# Altium PCB PWB.PcbDoc (part 4 of 5)
Units mm, origin at the board's own origin, x right, y up, seen from the top; angles counter-clockwise.
Board outline 202 x 125 mm, 2 copper layers (Top Layer, Bottom Layer), stack 1.576 mm thick; 208 components, 124 nets, 630 pads, 5440 vias.
Unrouted connection lines stored in the file: 98.
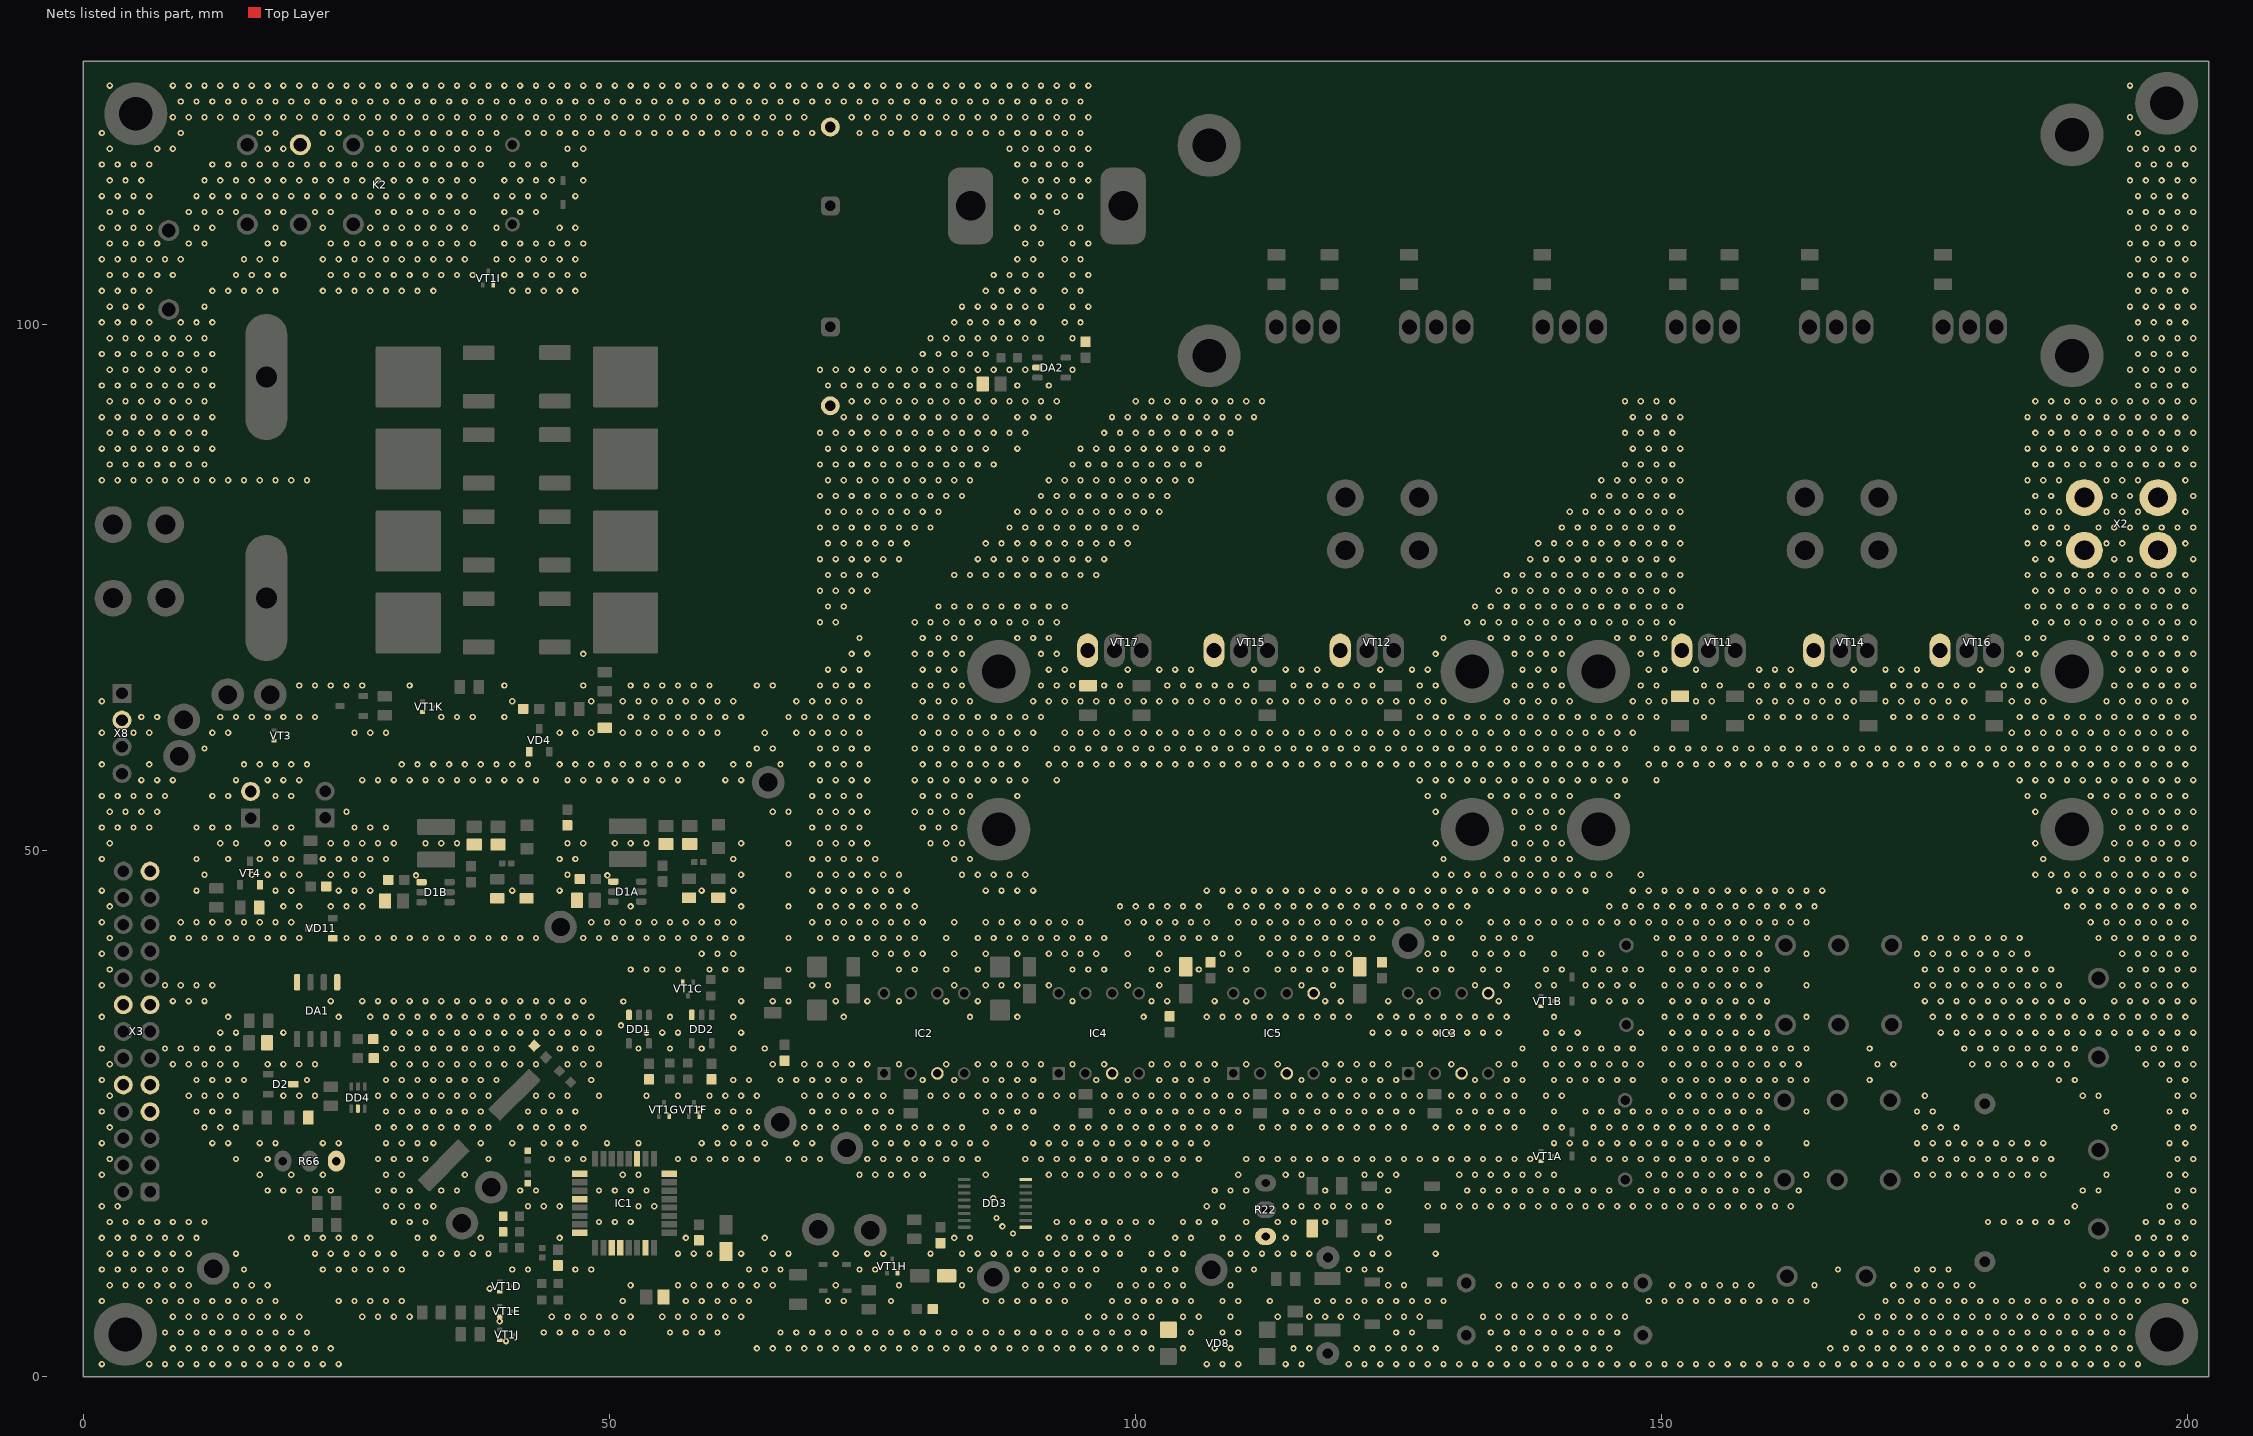
[diagram p3: the nets of this part, all layers, seen from the top]

## Via types
v1: diameter 0.6, hole 0.3, Top Layer to Bottom Layer, tented both sides, 5432 vias
v2: diameter 0.8, hole 0.4, Top Layer to Bottom Layer, tented both sides, 8 vias

## Nets (pads, with @x,y where several pads share a name; then routed paths per layer and width w, separated by ;. In a path a pad name is that pad's centre, name@x,y a point inside that pad or via, vN(x,y) a via of type N, cw(c..) or ccw(c..) an arc to the next point about the centre after c; other vN are vias at no path point) (continued)
GND: (continued)
  other v1: 1.772,1.18 6.272,1.18 7.772,1.18 9.272,1.18 10.772,1.18 12.272,1.18 13.772,1.18 15.272,1.18 16.772,1.18 18.272,1.18 19.772,1.18 21.272,1.18 22.772,1.18 24.272,1.18 106.772,1.18 108.272,1.18 109.772,1.18 114.272,1.18 115.772,1.18 120.272,1.18 121.772,1.18 123.272,1.18 124.772,1.18 126.272,1.18 127.772,1.18 129.272,1.18 130.772,1.18 132.272,1.18 133.772,1.18 135.272,1.18 136.772,1.18 138.272,1.18 139.772,1.18 141.272,1.18 142.772,1.18 144.272,1.18 145.772,1.18 147.272,1.18 148.772,1.18 150.272,1.18 151.772,1.18 153.272,1.18 154.772,1.18 156.272,1.18 157.772,1.18 159.272,1.18 160.772,1.18 162.272,1.18 163.772,1.18 165.272,1.18 166.772,1.18 168.272,1.18 169.772,1.18 171.272,1.18 172.772,1.18 174.272,1.18 175.772,1.18 177.272,1.18 178.772,1.18 180.272,1.18 181.772,1.18 183.272,1.18 184.772,1.18 186.272,1.18 187.772,1.18 189.272,1.18 190.772,1.18 192.272,1.18 193.772,1.18 195.272,1.18 8.522,2.68 10.022,2.68 11.522,2.68 13.022,2.68 14.522,2.68 16.022,2.68 17.522,2.68 19.022,2.68 20.522,2.68 22.022,2.68 23.522,2.68 64.022,2.68 65.522,2.68 67.022,2.68 68.522,2.68 70.022,2.68 71.522,2.68 73.022,2.68 74.522,2.68 76.022,2.68 77.522,2.68 79.022,2.68 80.522,2.68 82.022,2.68 83.522,2.68 85.022,2.68 86.522,2.68 88.022,2.68 89.522,2.68 91.022,2.68 92.522,2.68 94.022,2.68 95.522,2.68 97.022,2.68 98.522,2.68 100.022,2.68 101.522,2.68 104.522,2.68 107.522,2.68 109.022,2.68 115.022,2.68 116.522,2.68 121.022,2.68 122.522,2.68 124.022,2.68 125.522,2.68 127.022,2.68 128.522,2.68 134.522,2.68 136.022,2.68 137.522,2.68 139.022,2.68 140.522,2.68 142.022,2.68 143.522,2.68 145.022,2.68 166.022,2.68 167.522,2.68 169.022,2.68 170.522,2.68 172.022,2.68 173.522,2.68 175.022,2.68 176.522,2.68 178.022,2.68 179.522,2.68 181.022,2.68 182.522,2.68 184.022,2.68 185.522,2.68 187.022,2.68 188.522,2.68 190.022,2.68 191.522,2.68 193.022,2.68 194.522,2.68 7.772,4.18 9.272,4.18 10.772,4.18 12.272,4.18 13.772,4.18 15.272,4.18 16.772,4.18 18.272,4.18 19.772,4.18 21.272,4.18 43.772,4.18 45.272,4.18 46.772,4.18 48.272,4.18 49.772,4.18 51.272,4.18 55.772,4.18 57.272,4.18 58.772,4.18 60.272,4.18 66.272,4.18 67.772,4.18 69.272,4.18 70.772,4.18 72.272,4.18 73.772,4.18 75.272,4.18 76.772,4.18 78.272,4.18 79.772,4.18 81.272,4.18 82.772,4.18 84.272,4.18 85.772,4.18 87.272,4.18 88.772,4.18 90.272,4.18 91.772,4.18 93.272,4.18 94.772,4.18 96.272,4.18 97.772,4.18 99.272,4.18 100.772,4.18 105.272,4.18 108.272,4.18 109.772,4.18 124.772,4.18 126.272,4.18 133.772,4.18 135.272,4.18 136.772,4.18 138.272,4.18 139.772,4.18 141.272,4.18 142.772,4.18 144.272,4.18 145.772,4.18 168.272,4.18 169.772,4.18 171.272,4.18 172.772,4.18 174.272,4.18 175.772,4.18 177.272,4.18 178.772,4.18 180.272,4.18 181.772,4.18 183.272,4.18 184.772,4.18 186.272,4.18 187.772,4.18 189.272,4.18 190.772,4.18 192.272,4.18 193.772,4.18 39.573,5.258 8.522,5.68 10.022,5.68 11.522,5.68 13.022,5.68 14.522,5.68 16.022,5.68 17.522,5.68 19.022,5.68 20.522,5.68 26.522,5.68 28.022,5.68 29.522,5.68 31.022,5.68 44.522,5.68 46.022,5.68 47.522,5.68 49.022,5.68 50.522,5.68 52.022,5.68 55.022,5.68 56.522,5.68 58.022,5.68 59.522,5.68 61.022,5.68 62.522,5.68 95.522,5.68 97.022,5.68 98.522,5.68 100.022,5.68 101.522,5.68 104.522,5.68 106.022,5.68 109.022,5.68 113.522,5.68 116.522,5.68 118.022,5.68 119.522,5.68 121.022,5.68 124.022,5.68 125.522,5.68 127.022,5.68 133.022,5.68 134.522,5.68 136.022,5.68 137.522,5.68 139.022,5.68 140.522,5.68 142.022,5.68 143.522,5.68 145.022,5.68 146.522,5.68 169.022,5.68 170.522,5.68 172.022,5.68 173.522,5.68 175.022,5.68 176.522,5.68 178.022,5.68 179.522,5.68 181.022,5.68 182.522,5.68 184.022,5.68 185.522,5.68 187.022,5.68 188.522,5.68 190.022,5.68 191.522,5.68 193.022,5.68 194.522,5.68 1.772,7.18 6.272,7.18 7.772,7.18 9.272,7.18 10.772,7.18 12.272,7.18 13.772,7.18 15.272,7.18 16.772,7.18 18.272,7.18 24.272,7.18 25.772,7.18 27.272,7.18 28.772,7.18 30.272,7.18 51.272,7.18 57.272,7.18 58.772,7.18 60.272,7.18 61.772,7.18 63.272,7.18 70.772,7.18 72.272,7.18 76.772,7.18 85.772,7.18 87.272,7.18 88.772,7.18 90.272,7.18 91.772,7.18 93.272,7.18 97.772,7.18 99.272,7.18 100.772,7.18 102.272,7.18 103.772,7.18 105.272,7.18 108.272,7.18 109.772,7.18 112.772,7.18 117.272,7.18 118.772,7.18 120.272,7.18 121.772,7.18 123.272,7.18 124.772,7.18 126.272,7.18 127.772,7.18 129.272,7.18 148.772,7.18 150.272,7.18 151.772,7.18 153.272,7.18 154.772,7.18 156.272,7.18 157.772,7.18 159.272,7.18 160.772,7.18 162.272,7.18 163.772,7.18 171.272,7.18 172.772,7.18 174.272,7.18 175.772,7.18 177.272,7.18 178.772,7.18 180.272,7.18 181.772,7.18 183.272,7.18 184.772,7.18 186.272,7.18 187.772,7.18 189.272,7.18 190.772,7.18 192.272,7.18 193.772,7.18 195.272,7.18 199.772,7.18 38.633,8.357 2.522,8.68 4.022,8.68 5.522,8.68 7.022,8.68 8.522,8.68 10.022,8.68 14.522,8.68 16.022,8.68 17.522,8.68 52.022,8.68 56.522,8.68 58.022,8.68 59.522,8.68 61.022,8.68 62.522,8.68 64.022,8.68 65.522,8.68 71.522,8.68 77.522,8.68 83.522,8.68 89.522,8.68 91.022,8.68 92.522,8.68 94.022,8.68 95.522,8.68 98.522,8.68 100.022,8.68 101.522,8.68 103.022,8.68 104.522,8.68 109.022,8.68 124.022,8.68 125.522,8.68 134.522,8.68 136.022,8.68 137.522,8.68 139.022,8.68 140.522,8.68 142.022,8.68 143.522,8.68 145.022,8.68 146.522,8.68 151.022,8.68 152.522,8.68 154.022,8.68 155.522,8.68 157.022,8.68 158.522,8.68 164.522,8.68 172.022,8.68 173.522,8.68 175.022,8.68 176.522,8.68 178.022,8.68 179.522,8.68 190.022,8.68 191.522,8.68 193.022,8.68 194.522,8.68 196.022,8.68 197.522,8.68 199.022,8.68 200.522,8.68 1.772,10.18 3.272,10.18 4.772,10.18 6.272,10.18 7.772,10.18 9.272,10.18 15.272,10.18 22.772,10.18 24.272,10.18 25.772,10.18 27.272,10.18 28.772,10.18 30.272,10.18 40.772,10.18 42.272,10.18 46.772,10.18 48.272,10.18 63.272,10.18 64.772,10.18 66.272,10.18 73.772,10.18 75.272,10.18 84.272,10.18 88.772,10.18 90.272,10.18 91.772,10.18 93.272,10.18 94.772,10.18 96.272,10.18 100.772,10.18 102.272,10.18 103.772,10.18 109.772,10.18 111.272,10.18 120.272,10.18 121.772,10.18 123.272,10.18 166.772,10.18 174.272,10.18 175.772,10.18 177.272,10.18 192.272,10.18 193.772,10.18 195.272,10.18 196.772,10.18 198.272,10.18 199.772,10.18 2.522,11.68 4.022,11.68 5.522,11.68 7.022,11.68 8.522,11.68 10.022,11.68 14.522,11.68 22.022,11.68 23.522,11.68 25.022,11.68 26.522,11.68 28.022,11.68 29.522,11.68 32.522,11.68 34.022,11.68 35.522,11.68 37.022,11.68 38.522,11.68 56.522,11.68 58.022,11.68 59.522,11.68 62.522,11.68 65.522,11.68 67.022,11.68 71.522,11.68 74.522,11.68 76.022,11.68 80.522,11.68 83.522,11.68 85.022,11.68 86.522,11.68 88.022,11.68 89.522,11.68 91.022,11.68 92.522,11.68 94.022,11.68 95.522,11.68 97.022,11.68 98.522,11.68 101.522,11.68 103.022,11.68 104.522,11.68 109.022,11.68 110.522,11.68 112.022,11.68 113.522,11.68 115.022,11.68 116.522,11.68 121.022,11.68 122.522,11.68 124.022,11.68 128.522,11.68 193.022,11.68 194.522,11.68 196.022,11.68 197.522,11.68 199.022,11.68 200.522,11.68 1.772,13.18 3.272,13.18 4.772,13.18 6.272,13.18 7.772,13.18 9.272,13.18 10.772,13.18 19.772,13.18 21.272,13.18 22.772,13.18 24.272,13.18 25.772,13.18 27.272,13.18 31.772,13.18 33.272,13.18 37.772,13.18 45.272,13.18 57.272,13.18 64.772,13.18 82.772,13.18 84.272,13.18 91.772,13.18 93.272,13.18 94.772,13.18 96.272,13.18 97.772,13.18 99.272,13.18 103.772,13.18 105.272,13.18 108.272,13.18 109.772,13.18 114.272,13.18 123.272,13.18 195.272,13.18 196.772,13.18 198.272,13.18 199.772,13.18 88.367,13.589 87.351,14.275 2.522,14.68 4.022,14.68 5.522,14.68 7.022,14.68 8.522,14.68 10.022,14.68 11.522,14.68 29.522,14.68 31.022,14.68 32.522,14.68 49.022,14.68 50.522,14.68 52.022,14.68 92.522,14.68 94.022,14.68 95.522,14.68 97.022,14.68 98.522,14.68 100.022,14.68 101.522,14.68 104.522,14.68 106.022,14.68 107.522,14.68 110.522,14.68 113.522,14.68 115.022,14.68 118.022,14.68 124.022,14.68 181.022,14.68 182.522,14.68 184.022,14.68 185.522,14.68 187.022,14.68 188.522,14.68 196.022,14.68 197.522,14.68 199.022,14.68 200.522,14.68 86.792,15.062 1.772,16.18 3.272,16.18 28.772,16.18 30.272,16.18 31.772,16.18 33.272,16.18 42.272,16.18 43.772,16.18 45.272,16.18 52.772,16.18 54.272,16.18 106.772,16.18 108.272,16.18 114.272,16.18 115.772,16.18 117.272,16.18 118.772,16.18 120.272,16.18 121.772,16.18 123.272,16.18 127.772,16.18 129.272,16.18 130.772,16.18 132.272,16.18 133.772,16.18 135.272,16.18 136.772,16.18 138.272,16.18 139.772,16.18 141.272,16.18 142.772,16.18 144.272,16.18 145.772,16.18 147.272,16.18 148.772,16.18 150.272,16.18 151.772,16.18 153.272,16.18 154.772,16.18 156.272,16.18 157.772,16.18 159.272,16.18 160.772,16.18 162.272,16.18 189.272,16.18 198.272,16.18 199.772,16.18 86.487,16.942 17.522,17.68 19.022,17.68 20.522,17.68 22.022,17.68 23.522,17.68 28.022,17.68 29.522,17.68 31.022,17.68 34.022,17.68 35.522,17.68 41.522,17.68 43.022,17.68 49.022,17.68 50.522,17.68 52.022,17.68 53.522,17.68 107.522,17.68 109.022,17.68 110.522,17.68 118.022,17.68 124.022,17.68 131.522,17.68 133.022,17.68 134.522,17.68 136.022,17.68 137.522,17.68 139.022,17.68 140.522,17.68 142.022,17.68 143.522,17.68 145.022,17.68 148.022,17.68 149.522,17.68 151.022,17.68 152.522,17.68 154.022,17.68 155.522,17.68 157.022,17.68 158.522,17.68 160.022,17.68 163.022,17.68 190.022,17.68 191.522,17.68 199.022,17.68 200.522,17.68 1.772,19.18 16.772,19.18 19.772,19.18 22.772,19.18 28.772,19.18 30.272,19.18 36.272,19.18 51.272,19.18 52.772,19.18 73.772,19.18 75.272,19.18 76.772,19.18 78.272,19.18 79.772,19.18 85.772,19.18 91.772,19.18 93.272,19.18 94.772,19.18 96.272,19.18 97.772,19.18 99.272,19.18 100.772,19.18 102.272,19.18 103.772,19.18 109.772,19.18 114.272,19.18 115.772,19.18 121.772,19.18 123.272,19.18 124.772,19.18 130.772,19.18 132.272,19.18 133.772,19.18 135.272,19.18 136.772,19.18 138.272,19.18 139.772,19.18 148.772,19.18 150.272,19.18 151.772,19.18 153.272,19.18 154.772,19.18 156.272,19.18 157.772,19.18 159.272,19.18 163.772,19.18 174.272,19.18 175.772,19.18 177.272,19.18 178.772,19.18 180.272,19.18 181.772,19.18 183.272,19.18 184.772,19.18 186.272,19.18 192.272,19.18 198.272,19.18 199.772,19.18 2.522,20.68 14.522,20.68 17.522,20.68 28.022,20.68 29.522,20.68 31.022,20.68 32.522,20.68 38.522,20.68 44.522,20.68 46.022,20.68 47.522,20.68 56.522,20.68 58.022,20.68 59.522,20.68 61.022,20.68 62.522,20.68 64.022,20.68 67.022,20.68 68.522,20.68 70.022,20.68 74.522,20.68 76.022,20.68 77.522,20.68 79.022,20.68 80.522,20.68 82.022,20.68 83.522,20.68 85.022,20.68 89.522,20.68 91.022,20.68 92.522,20.68 94.022,20.68 95.522,20.68 97.022,20.68 98.522,20.68 100.022,20.68 101.522,20.68 103.022,20.68 104.522,20.68 106.022,20.68 110.522,20.68 112.022,20.68 113.522,20.68 115.022,20.68 116.522,20.68 118.022,20.68 119.522,20.68 121.022,20.68 122.522,20.68 124.022,20.68 125.522,20.68 127.022,20.68 128.522,20.68 130.022,20.68 131.522,20.68 133.022,20.68 134.522,20.68 136.022,20.68 137.522,20.68 143.522,20.68 145.022,20.68 146.522,20.68 148.022,20.68 149.522,20.68 151.022,20.68 152.522,20.68 154.022,20.68 155.522,20.68 157.022,20.68 158.522,20.68 160.022,20.68 175.022,20.68 176.522,20.68 178.022,20.68 179.522,20.68 181.022,20.68 182.522,20.68 184.022,20.68 185.522,20.68 187.022,20.68 199.022,20.68 200.522,20.68 1.772,22.18 12.272,22.18 13.772,22.18 16.772,22.18 18.272,22.18 22.772,22.18 24.272,22.18 28.772,22.18 30.272,22.18 31.772,22.18 33.272,22.18 37.772,22.18 40.772,22.18 43.772,22.18 45.272,22.18 46.772,22.18 49.772,22.18 52.772,22.18 58.772,22.18 60.272,22.18 61.772,22.18 63.272,22.18 64.772,22.18 67.772,22.18 69.272,22.18 75.272,22.18 76.772,22.18 78.272,22.18 79.772,22.18 81.272,22.18 82.772,22.18 84.272,22.18 85.772,22.18 90.272,22.18 91.772,22.18 93.272,22.18 94.772,22.18 96.272,22.18 97.772,22.18 99.272,22.18 100.772,22.18 102.272,22.18 103.772,22.18 105.272,22.18 106.772,22.18 139.772,22.18 141.272,22.18 142.772,22.18 144.272,22.18 145.772,22.18 147.272,22.18 148.772,22.18 150.272,22.18 151.772,22.18 153.272,22.18 154.772,22.18 156.272,22.18 157.772,22.18 159.272,22.18 163.772,22.18 174.272,22.18 175.772,22.18 177.272,22.18 178.772,22.18 180.272,22.18 181.772,22.18 183.272,22.18 184.772,22.18 186.272,22.18 198.272,22.18 199.772,22.18 2.522,23.68 11.522,23.68 13.022,23.68 14.522,23.68 28.022,23.68 29.522,23.68 31.022,23.68 32.522,23.68 34.022,23.68 35.522,23.68 37.022,23.68 38.522,23.68 41.522,23.68 43.022,23.68 44.522,23.68 46.022,23.68 47.522,23.68 61.022,23.68 62.522,23.68 64.022,23.68 68.522,23.68 70.022,23.68 71.522,23.68 74.522,23.68 76.022,23.68 77.522,23.68 79.022,23.68 80.522,23.68 82.022,23.68 83.522,23.68 86.522,23.68 88.022,23.68 89.522,23.68 92.522,23.68 94.022,23.68 95.522,23.68 97.022,23.68 98.522,23.68 100.022,23.68 101.522,23.68 103.022,23.68 104.522,23.68 106.022,23.68 107.522,23.68 109.022,23.68 112.022,23.68 113.522,23.68 115.022,23.68 116.522,23.68 118.022,23.68 119.522,23.68 121.022,23.68 122.522,23.68 124.022,23.68 125.522,23.68 128.522,23.68 130.022,23.68 131.522,23.68 133.022,23.68 134.522,23.68 136.022,23.68 139.022,23.68 140.522,23.68 143.522,23.68 145.022,23.68 146.522,23.68 148.022,23.68 149.522,23.68 151.022,23.68 152.522,23.68 154.022,23.68 155.522,23.68 157.022,23.68 158.522,23.68 160.022,23.68 175.022,23.68 176.522,23.68 178.022,23.68 193.022,23.68 199.022,23.68 200.522,23.68 1.772,25.18 10.772,25.18 12.272,25.18 13.772,25.18 28.772,25.18 30.272,25.18 31.772,25.18 33.272,25.18 34.772,25.18 36.272,25.18 37.772,25.18 42.272,25.18 43.772,25.18 45.272,25.18 46.772,25.18 60.272,25.18 61.772,25.18 63.272,25.18 69.272,25.18 70.772,25.18 72.272,25.18 73.772,25.18 75.272,25.18 76.772,25.18 85.772,25.18 87.272,25.18 88.772,25.18 90.272,25.18 97.772,25.18 99.272,25.18 100.772,25.18 102.272,25.18 103.772,25.18 105.272,25.18 106.772,25.18 108.272,25.18 109.772,25.18 114.272,25.18 115.772,25.18 117.272,25.18 118.772,25.18 120.272,25.18 121.772,25.18 123.272,25.18 124.772,25.18 126.272,25.18 130.772,25.18 132.272,25.18 133.772,25.18 135.272,25.18 136.772,25.18 139.772,25.18 142.772,25.18 144.272,25.18 145.772,25.18 147.272,25.18 148.772,25.18 150.272,25.18 151.772,25.18 153.272,25.18 154.772,25.18 156.272,25.18 157.772,25.18 159.272,25.18 163.772,25.18 174.272,25.18 175.772,25.18 192.272,25.18 198.272,25.18 199.772,25.18 2.522,26.68 10.022,26.68 11.522,26.68 13.022,26.68 14.522,26.68 19.022,26.68 20.522,26.68 22.022,26.68 28.022,26.68 29.522,26.68 31.022,26.68 32.522,26.68 34.022,26.68 35.522,26.68 37.022,26.68 38.522,26.68 43.022,26.68 44.522,26.68 46.022,26.68 49.022,26.68 53.522,26.68 56.522,26.68 59.522,26.68 61.022,26.68 62.522,26.68 64.022,26.68 68.522,26.68 70.022,26.68 71.522,26.68 73.022,26.68 74.522,26.68 76.022,26.68 80.522,26.68 82.022,26.68 83.522,26.68 85.022,26.68 86.522,26.68 88.022,26.68 89.522,26.68 91.022,26.68 92.522,26.68 94.022,26.68 97.022,26.68 98.522,26.68 100.022,26.68 101.522,26.68 103.022,26.68 104.522,26.68 106.022,26.68 107.522,26.68 109.022,26.68 110.522,26.68 113.522,26.68 115.022,26.68 116.522,26.68 118.022,26.68 119.522,26.68 121.022,26.68 122.522,26.68 124.022,26.68 125.522,26.68 127.022,26.68 130.022,26.68 131.522,26.68 133.022,26.68 134.522,26.68 136.022,26.68 139.022,26.68 140.522,26.68 151.022,26.68 152.522,26.68 154.022,26.68 155.522,26.68 157.022,26.68 158.522,26.68 160.022,26.68 175.022,26.68 190.022,26.68 191.522,26.68 199.022,26.68 200.522,26.68 1.772,28.18 10.772,28.18 12.272,28.18 13.772,28.18 15.272,28.18 21.272,28.18 28.772,28.18 30.272,28.18 31.772,28.18 33.272,28.18 34.772,28.18 36.272,28.18 37.772,28.18 39.272,28.18 48.272,28.18 61.772,28.18 63.272,28.18 66.272,28.18 67.772,28.18 69.272,28.18 70.772,28.18 72.272,28.18 73.772,28.18 79.772,28.18 82.772,28.18 85.772,28.18 87.272,28.18 88.772,28.18 90.272,28.18 96.272,28.18 99.272,28.18 102.272,28.18 103.772,28.18 105.272,28.18 106.772,28.18 115.772,28.18 118.772,28.18 120.272,28.18 121.772,28.18 123.272,28.18 124.772,28.18 132.272,28.18 135.272,28.18 136.772,28.18 139.772,28.18 141.272,28.18 142.772,28.18 144.272,28.18 145.772,28.18 147.272,28.18 150.272,28.18 151.772,28.18 153.272,28.18 154.772,28.18 156.272,28.18 157.772,28.18 159.272,28.18 160.772,28.18 162.272,28.18 163.772,28.18 169.772,28.18 187.772,28.18 189.272,28.18 198.272,28.18 199.772,28.18 2.522,29.68 8.522,29.68 10.022,29.68 11.522,29.68 13.022,29.68 14.522,29.68 17.522,29.68 19.022,29.68 20.522,29.68 22.022,29.68 29.522,29.68 31.022,29.68 32.522,29.68 34.022,29.68 35.522,29.68 37.022,29.68 38.522,29.68 40.022,29.68 41.522,29.68 43.022,29.68 46.022,29.68 47.522,29.68 49.022,29.68 65.522,29.68 68.522,29.68 70.022,29.68 71.522,29.68 73.022,29.68 74.522,29.68 77.522,29.68 82.022,29.68 85.022,29.68 86.522,29.68 88.022,29.68 89.522,29.68 91.022,29.68 94.022,29.68 97.022,29.68 101.522,29.68 103.022,29.68 104.522,29.68 106.022,29.68 107.522,29.68 110.522,29.68 113.522,29.68 118.022,29.68 119.522,29.68 121.022,29.68 122.522,29.68 124.022,29.68 127.022,29.68 130.022,29.68 134.522,29.68 136.022,29.68 139.022,29.68 140.522,29.68 142.022,29.68 143.522,29.68 145.022,29.68 146.522,29.68 148.022,29.68 151.022,29.68 152.522,29.68 154.022,29.68 155.522,29.68 157.022,29.68 158.522,29.68 160.022,29.68 161.522,29.68 163.022,29.68 170.522,29.68 172.022,29.68 179.522,29.68 181.022,29.68 182.522,29.68 184.022,29.68 185.522,29.68 187.022,29.68 188.522,29.68 196.022,29.68 197.522,29.68 199.022,29.68 200.522,29.68 1.772,31.18 7.772,31.18 9.272,31.18 10.772,31.18 12.272,31.18 13.772,31.18 28.772,31.18 30.272,31.18 31.772,31.18 33.272,31.18 34.772,31.18 36.272,31.18 37.772,31.18 39.272,31.18 40.772,31.18 45.272,31.18 46.772,31.18 48.272,31.18 52.772,31.18 55.772,31.18 58.772,31.18 61.772,31.18 64.772,31.18 136.772,31.18 139.772,31.18 141.272,31.18 142.772,31.18 144.272,31.18 145.772,31.18 147.272,31.18 150.272,31.18 151.772,31.18 153.272,31.18 154.772,31.18 156.272,31.18 157.772,31.18 159.272,31.18 160.772,31.18 162.272,31.18 163.772,31.18 169.772,31.18 178.772,31.18 180.272,31.18 181.772,31.18 183.272,31.18 184.772,31.18 186.272,31.18 187.772,31.18 189.272,31.18 195.272,31.18 196.772,31.18 198.272,31.18 199.772,31.18 13.022,32.68 14.522,32.68 19.022,32.68 29.522,32.68 31.022,32.68 32.522,32.68 34.022,32.68 35.522,32.68 37.022,32.68 38.522,32.68 40.022,32.68 41.522,32.68 43.022,32.68 44.522,32.68 46.022,32.68 47.522,32.68 49.022,32.68 53.522,32.68 55.022,32.68 56.522,32.68 62.522,32.68 122.522,32.68 124.022,32.68 125.522,32.68 127.022,32.68 128.522,32.68 130.022,32.68 131.522,32.68 133.022,32.68 134.522,32.68 139.022,32.68 140.522,32.68 142.022,32.68 148.022,32.68 151.022,32.68 152.522,32.68 154.022,32.68 155.522,32.68 157.022,32.68 158.522,32.68 160.022,32.68 176.522,32.68 178.022,32.68 179.522,32.68 181.022,32.68 182.522,32.68 184.022,32.68 185.522,32.68 187.022,32.68 188.522,32.68 190.022,32.68 191.522,32.68 193.022,32.68 194.522,32.68 196.022,32.68 197.522,32.68 199.022,32.68 200.522,32.68 51.105,33.376 1.772,34.18 13.772,34.18 24.272,34.18 27.272,34.18 28.772,34.18 30.272,34.18 31.772,34.18 33.272,34.18 34.772,34.18 36.272,34.18 37.772,34.18 39.272,34.18 40.772,34.18 42.272,34.18 43.772,34.18 45.272,34.18 46.772,34.18 48.272,34.18 55.772,34.18 61.772,34.18 72.272,34.18 84.272,34.18 88.772,34.18 100.772,34.18 106.772,34.18 108.272,34.18 109.772,34.18 111.272,34.18 112.772,34.18 114.272,34.18 115.772,34.18 117.272,34.18 118.772,34.18 120.272,34.18 123.272,34.18 124.772,34.18 126.272,34.18 127.772,34.18 129.272,34.18 130.772,34.18 132.272,34.18 133.772,34.18 135.272,34.18 139.772,34.18 150.272,34.18 151.772,34.18 153.272,34.18 154.772,34.18 156.272,34.18 157.772,34.18 159.272,34.18 163.772,34.18 175.772,34.18 177.272,34.18 178.772,34.18 180.272,34.18 181.772,34.18 183.272,34.18 184.772,34.18 186.272,34.18 187.772,34.18 189.272,34.18 190.772,34.18 192.272,34.18 193.772,34.18 195.272,34.18 196.772,34.18 198.272,34.18 199.772,34.18 51.333,35.636 8.522,35.68 10.022,35.68 11.522,35.68 23.522,35.68 26.522,35.68 28.022,35.68 29.522,35.68 31.022,35.68 32.522,35.68 34.022,35.68 35.522,35.68 37.022,35.68 38.522,35.68 40.022,35.68 41.522,35.68 43.022,35.68 44.522,35.68 46.022,35.68 47.522,35.68 62.522,35.68 65.522,35.68 67.022,35.68 71.522,35.68 74.522,35.68 77.522,35.68 82.022,35.68 85.022,35.68 94.022,35.68 101.522,35.68 103.022,35.68 107.522,35.68 110.522,35.68 118.022,35.68 119.522,35.68 124.022,35.68 127.022,35.68 134.522,35.68 143.522,35.68 145.022,35.68 146.522,35.68 148.022,35.68 151.022,35.68 152.522,35.68 154.022,35.68 155.522,35.68 157.022,35.68 158.522,35.68 160.022,35.68 175.022,35.68 176.522,35.68 178.022,35.68 179.522,35.68 181.022,35.68 182.522,35.68 184.022,35.68 185.522,35.68 187.022,35.68 188.522,35.68 190.022,35.68 193.022,35.68 194.522,35.68 196.022,35.68 197.522,35.68 199.022,35.68 200.522,35.68 1.772,37.18 7.772,37.18 9.272,37.18 10.772,37.18 12.272,37.18 69.272,37.18 70.772,37.18 82.772,37.18 85.772,37.18 87.272,37.18 88.772,37.18 91.772,37.18 99.272,37.18 102.272,37.18 115.772,37.18 118.772,37.18 132.272,37.18 135.272,37.18 138.272,37.18 139.772,37.18 142.772,37.18 144.272,37.18 145.772,37.18 147.272,37.18 150.272,37.18 151.772,37.18 153.272,37.18 154.772,37.18 156.272,37.18 157.772,37.18 159.272,37.18 163.772,37.18 174.272,37.18 175.772,37.18 177.272,37.18 178.772,37.18 180.272,37.18 181.772,37.18 183.272,37.18 184.772,37.18 186.272,37.18 187.772,37.18 193.772,37.18 195.272,37.18 196.772,37.18 198.272,37.18 199.772,37.18 2.522,38.68 52.022,38.68 53.522,38.68 55.022,38.68 56.522,38.68 59.522,38.68 61.022,38.68 62.522,38.68 67.022,38.68 77.522,38.68 79.022,38.68 82.022,38.68 85.022,38.68 94.022,38.68 95.522,38.68 97.022,38.68 101.522,38.68 103.022,38.68 106.022,38.68 109.022,38.68 110.522,38.68 113.522,38.68 115.022,38.68 116.522,38.68 118.022,38.68 119.522,38.68 127.022,38.68 128.522,38.68 130.022,38.68 133.022,38.68 134.522,38.68 139.022,38.68 140.522,38.68 143.522,38.68 145.022,38.68 146.522,38.68 148.022,38.68 151.022,38.68 152.522,38.68 154.022,38.68 155.522,38.68 157.022,38.68 158.522,38.68 160.022,38.68 175.022,38.68 176.522,38.68 178.022,38.68 179.522,38.68 181.022,38.68 182.522,38.68 184.022,38.68 185.522,38.68 187.022,38.68 194.522,38.68 196.022,38.68 197.522,38.68 199.022,38.68 200.522,38.68 1.772,40.18 58.772,40.18 60.272,40.18 61.772,40.18 75.272,40.18 76.772,40.18 78.272,40.18 79.772,40.18 82.772,40.18 85.772,40.18 88.772,40.18 91.772,40.18 93.272,40.18 94.772,40.18 96.272,40.18 99.272,40.18 102.272,40.18 108.272,40.18 109.772,40.18 112.772,40.18 114.272,40.18 115.772,40.18 117.272,40.18 118.772,40.18 120.272,40.18 127.772,40.18 129.272,40.18 132.272,40.18 133.772,40.18 135.272,40.18 136.772,40.18 139.772,40.18 142.772,40.18 144.272,40.18 150.272,40.18 151.772,40.18 153.272,40.18 154.772,40.18 156.272,40.18 157.772,40.18 159.272,40.18 163.772,40.18 174.272,40.18 175.772,40.18 177.272,40.18 178.772,40.18 180.272,40.18 181.772,40.18 183.272,40.18 184.772,40.18 193.772,40.18 195.272,40.18 196.772,40.18 198.272,40.18 199.772,40.18 2.522,41.68 8.522,41.68 10.022,41.68 11.522,41.68 13.022,41.68 14.522,41.68 16.022,41.68 17.522,41.68 19.022,41.68 20.522,41.68 25.022,41.68 26.522,41.68 28.022,41.68 29.522,41.68 31.022,41.68 32.522,41.68 34.022,41.68 35.522,41.68 37.022,41.68 38.522,41.68 40.022,41.68 41.522,41.68 43.022,41.68 47.522,41.68 49.022,41.68 50.522,41.68 52.022,41.68 53.522,41.68 55.022,41.68 56.522,41.68 58.022,41.68 59.522,41.68 61.022,41.68 62.522,41.68 67.022,41.68 70.022,41.68 71.522,41.68 73.022,41.68 74.522,41.68 76.022,41.68 77.522,41.68 79.022,41.68 82.022,41.68 85.022,41.68 86.522,41.68 88.022,41.68 89.522,41.68 91.022,41.68 92.522,41.68 94.022,41.68 95.522,41.68 97.022,41.68 101.522,41.68 103.022,41.68 104.522,41.68 106.022,41.68 107.522,41.68 109.022,41.68 112.022,41.68 113.522,41.68 115.022,41.68 116.522,41.68 118.022,41.68 119.522,41.68 121.022,41.68 122.522,41.68 128.522,41.68 130.022,41.68 133.022,41.68 134.522,41.68 136.022,41.68 137.522,41.68 149.522,41.68 151.022,41.68 152.522,41.68 154.022,41.68 155.522,41.68 157.022,41.68 158.522,41.68 160.022,41.68 175.022,41.68 176.522,41.68 178.022,41.68 179.522,41.68 181.022,41.68 182.522,41.68 184.022,41.68 191.522,41.68 193.022,41.68 194.522,41.68 196.022,41.68 197.522,41.68 199.022,41.68 200.522,41.68 1.772,43.18 9.272,43.18 10.772,43.18 12.272,43.18 13.772,43.18 15.272,43.18 16.772,43.18 18.272,43.18 19.772,43.18 48.272,43.18 49.772,43.18 51.272,43.18 52.772,43.18 54.272,43.18 55.772,43.18 57.272,43.18 58.772,43.18 60.272,43.18 61.772,43.18 69.272,43.18 70.772,43.18 72.272,43.18 73.772,43.18 75.272,43.18 76.772,43.18 78.272,43.18 79.772,43.18 82.772,43.18 85.772,43.18 87.272,43.18 88.772,43.18 90.272,43.18 91.772,43.18 93.272,43.18 94.772,43.18 99.272,43.18 100.772,43.18 102.272,43.18 103.772,43.18 105.272,43.18 106.772,43.18 109.772,43.18 111.272,43.18 112.772,43.18 114.272,43.18 115.772,43.18 117.272,43.18 118.772,43.18 120.272,43.18 121.772,43.18 123.272,43.18 124.772,43.18 127.772,43.18 129.272,43.18 130.772,43.18 133.772,43.18 135.272,43.18 136.772,43.18 138.272,43.18 139.772,43.18 141.272,43.18 142.772,43.18 144.272,43.18 145.772,43.18 147.272,43.18 148.772,43.18 150.272,43.18 151.772,43.18 153.272,43.18 154.772,43.18 156.272,43.18 157.772,43.18 159.272,43.18 160.772,43.18 162.272,43.18 163.772,43.18 190.772,43.18 192.272,43.18 193.772,43.18 195.272,43.18 196.772,43.18 198.272,43.18 199.772,43.18 2.522,44.68 19.022,44.68 20.522,44.68 23.522,44.68 25.022,44.68 26.522,44.68 52.022,44.68 62.522,44.68 67.022,44.68 70.022,44.68 71.522,44.68 73.022,44.68 74.522,44.68 76.022,44.68 77.522,44.68 79.022,44.68 98.522,44.68 100.022,44.68 101.522,44.68 103.022,44.68 104.522,44.68 106.022,44.68 109.022,44.68 110.522,44.68 112.022,44.68 113.522,44.68 115.022,44.68 116.522,44.68 118.022,44.68 119.522,44.68 121.022,44.68 122.522,44.68 124.022,44.68 125.522,44.68 127.022,44.68 128.522,44.68 130.022,44.68 131.522,44.68 145.022,44.68 146.522,44.68 148.022,44.68 149.522,44.68 151.022,44.68 152.522,44.68 154.022,44.68 155.522,44.68 157.022,44.68 158.522,44.68 160.022,44.68 161.522,44.68 163.022,44.68 164.522,44.68 188.522,44.68 190.022,44.68 191.522,44.68 193.022,44.68 194.522,44.68 196.022,44.68 197.522,44.68 199.022,44.68 200.522,44.68 1.772,46.18 10.772,46.18 18.272,46.18 19.772,46.18 24.272,46.18 25.772,46.18 27.272,46.18 40.772,46.18 45.272,46.18 58.772,46.18 61.772,46.18 69.272,46.18 70.772,46.18 72.272,46.18 73.772,46.18 75.272,46.18 76.772,46.18 78.272,46.18 85.772,46.18 87.272,46.18 88.772,46.18 90.272,46.18 106.772,46.18 108.272,46.18 109.772,46.18 111.272,46.18 112.772,46.18 114.272,46.18 115.772,46.18 117.272,46.18 118.772,46.18 120.272,46.18 121.772,46.18 123.272,46.18 124.772,46.18 126.272,46.18 127.772,46.18 129.272,46.18 130.772,46.18 132.272,46.18 133.772,46.18 135.272,46.18 136.772,46.18 138.272,46.18 139.772,46.18 141.272,46.18 142.772,46.18 147.272,46.18 148.772,46.18 150.272,46.18 151.772,46.18 153.272,46.18 154.772,46.18 156.272,46.18 157.772,46.18 159.272,46.18 160.772,46.18 162.272,46.18 163.772,46.18 165.272,46.18 187.772,46.18 189.272,46.18 190.772,46.18 192.272,46.18 193.772,46.18 195.272,46.18 196.772,46.18 198.272,46.18 199.772,46.18 31.623,47.625 49.809,47.625 11.522,47.68 16.022,47.68 17.522,47.68 19.022,47.68 20.522,47.68 23.522,47.68 25.022,47.68 26.522,47.68 46.022,47.68 62.522,47.68 67.022,47.68 70.022,47.68 71.522,47.68 73.022,47.68 74.522,47.68 76.022,47.68 77.522,47.68 83.522,47.68 85.022,47.68 86.522,47.68 88.022,47.68 89.522,47.68 128.522,47.68 130.022,47.68 131.522,47.68 133.022,47.68 134.522,47.68 136.022,47.68 137.522,47.68 139.022,47.68 140.522,47.68 142.022,47.68 143.522,47.68 145.022,47.68 148.022,47.68 185.522,47.68 187.022,47.68 188.522,47.68 190.022,47.68 191.522,47.68 193.022,47.68 194.522,47.68 196.022,47.68 197.522,47.68 199.022,47.68 200.522,47.68 1.772,49.18 10.772,49.18 13.772,49.18 16.772,49.18 18.272,49.18 19.772,49.18 22.772,49.18 24.272,49.18 25.772,49.18 27.272,49.18 28.772,49.18 45.272,49.18 46.772,49.18 61.772,49.18 69.272,49.18 70.772,49.18 72.272,49.18 73.772,49.18 75.272,49.18 82.772,49.18 84.272,49.18 129.272,49.18 135.272,49.18 136.772,49.18 138.272,49.18 139.772,49.18 141.272,49.18 186.272,49.18 192.272,49.18 193.772,49.18 195.272,49.18 196.772,49.18 198.272,49.18 199.772,49.18 2.522,50.68 13.022,50.68 14.522,50.68 17.522,50.68 19.022,50.68 23.522,50.68 25.022,50.68 26.522,50.68 28.022,50.68 29.522,50.68 32.522,50.68 34.022,50.68 35.522,50.68 46.022,50.68 47.522,50.68 50.522,50.68 52.022,50.68 53.522,50.68 62.522,50.68 67.022,50.68 70.022,50.68 71.522,50.68 73.022,50.68 74.522,50.68 80.522,50.68 82.022,50.68 83.522,50.68 128.522,50.68 136.022,50.68 137.522,50.68 139.022,50.68 140.522,50.68 185.522,50.68 193.022,50.68 194.522,50.68 196.022,50.68 197.522,50.68 199.022,50.68 200.522,50.68 1.772,52.18 3.272,52.18 4.772,52.18 6.272,52.18 10.772,52.18 12.272,52.18 13.772,52.18 18.272,52.18 19.772,52.18 25.772,52.18 27.272,52.18 28.772,52.18 69.272,52.18 70.772,52.18 72.272,52.18 73.772,52.18 79.772,52.18 81.272,52.18 82.772,52.18 136.772,52.18 138.272,52.18 139.772,52.18 193.772,52.18 195.272,52.18 196.772,52.18 198.272,52.18 199.772,52.18 2.522,53.68 4.022,53.68 5.522,53.68 7.022,53.68 25.022,53.68 65.522,53.68 67.022,53.68 70.022,53.68 71.522,53.68 73.022,53.68 74.522,53.68 79.022,53.68 80.522,53.68 82.022,53.68 83.522,53.68 128.522,53.68 136.022,53.68 137.522,53.68 139.022,53.68 140.522,53.68 185.522,53.68 193.022,53.68 194.522,53.68 196.022,53.68 197.522,53.68 199.022,53.68 200.522,53.68 1.772,55.18 3.272,55.18 4.772,55.18 6.272,55.18 7.772,55.18 12.272,55.18 13.772,55.18 18.272,55.18 19.772,55.18 69.272,55.18 70.772,55.18 72.272,55.18 73.772,55.18 79.772,55.18 81.272,55.18 82.772,55.18 84.272,55.18 88.772,55.18 127.772,55.18 129.272,55.18 133.772,55.18 135.272,55.18 136.772,55.18 138.272,55.18 139.772,55.18 141.272,55.18 145.772,55.18 184.772,55.18 186.272,55.18 190.772,55.18 192.272,55.18 193.772,55.18 195.272,55.18 196.772,55.18 198.272,55.18 199.772,55.18 5.522,56.68 7.022,56.68 8.522,56.68 14.522,56.68 17.522,56.68 19.022,56.68 20.522,56.68 26.522,56.68 28.022,56.68 29.522,56.68 31.022,56.68 32.522,56.68 34.022,56.68 35.522,56.68 37.022,56.68 38.522,56.68 40.022,56.68 41.522,56.68 43.022,56.68 46.022,56.68 47.522,56.68 49.022,56.68 50.522,56.68 52.022,56.68 53.522,56.68 55.022,56.68 56.522,56.68 61.022,56.68 62.522,56.68 70.022,56.68 71.522,56.68 73.022,56.68 74.522,56.68 79.022,56.68 80.522,56.68 82.022,56.68 83.522,56.68 85.022,56.68 86.522,56.68 88.022,56.68 89.522,56.68 92.522,56.68 127.022,56.68 128.522,56.68 130.022,56.68 131.522,56.68 133.022,56.68 134.522,56.68 136.022,56.68 137.522,56.68 139.022,56.68 140.522,56.68 142.022,56.68 143.522,56.68 145.022,56.68 146.522,56.68 149.522,56.68 184.022,56.68 185.522,56.68 187.022,56.68 188.522,56.68 190.022,56.68 191.522,56.68 193.022,56.68 194.522,56.68 196.022,56.68 197.522,56.68 199.022,56.68 200.522,56.68 1.772,58.18 6.272,58.18 15.272,58.18 16.772,58.18 18.272,58.18 19.772,58.18 21.272,58.18 30.272,58.18 31.772,58.18 33.272,58.18 34.772,58.18 36.272,58.18 37.772,58.18 39.272,58.18 40.772,58.18 42.272,58.18 45.272,58.18 46.772,58.18 48.272,58.18 49.772,58.18 51.272,58.18 52.772,58.18 54.272,58.18 55.772,58.18 57.272,58.18 58.772,58.18 61.772,58.18 63.272,58.18 66.272,58.18 69.272,58.18 70.772,58.18 72.272,58.18 73.772,58.18 79.772,58.18 81.272,58.18 82.772,58.18 84.272,58.18 85.772,58.18 87.272,58.18 88.772,58.18 91.772,58.18 93.272,58.18 94.772,58.18 96.272,58.18 97.772,58.18 99.272,58.18 100.772,58.18 102.272,58.18 103.772,58.18 105.272,58.18 106.772,58.18 108.272,58.18 109.772,58.18 111.272,58.18 112.772,58.18 114.272,58.18 115.772,58.18 117.272,58.18 118.772,58.18 120.272,58.18 121.772,58.18 123.272,58.18 124.772,58.18 126.272,58.18 127.772,58.18 129.272,58.18 130.772,58.18 132.272,58.18 133.772,58.18 135.272,58.18 136.772,58.18 138.272,58.18 139.772,58.18 141.272,58.18 142.772,58.18 144.272,58.18 145.772,58.18 148.772,58.18 150.272,58.18 151.772,58.18 153.272,58.18 154.772,58.18 156.272,58.18 157.772,58.18 159.272,58.18 160.772,58.18 162.272,58.18 163.772,58.18 165.272,58.18 166.772,58.18 168.272,58.18 169.772,58.18 171.272,58.18 172.772,58.18 174.272,58.18 175.772,58.18 177.272,58.18 178.772,58.18 180.272,58.18 181.772,58.18 183.272,58.18 184.772,58.18 186.272,58.18 187.772,58.18 189.272,58.18 190.772,58.18 192.272,58.18 193.772,58.18 195.272,58.18 196.772,58.18 198.272,58.18 199.772,58.18 11.522,59.68 64.022,59.68 65.522,59.68 70.022,59.68 71.522,59.68 73.022,59.68 74.522,59.68 79.022,59.68 80.522,59.68 82.022,59.68 83.522,59.68 85.022,59.68 86.522,59.68 88.022,59.68 89.522,59.68 92.522,59.68 94.022,59.68 95.522,59.68 97.022,59.68 98.522,59.68 100.022,59.68 101.522,59.68 103.022,59.68 104.522,59.68 106.022,59.68 107.522,59.68 109.022,59.68 110.522,59.68 112.022,59.68 113.522,59.68 115.022,59.68 116.522,59.68 118.022,59.68 119.522,59.68 121.022,59.68 122.522,59.68 124.022,59.68 125.522,59.68 127.022,59.68 128.522,59.68 130.022,59.68 131.522,59.68 133.022,59.68 134.522,59.68 136.022,59.68 137.522,59.68 139.022,59.68 140.522,59.68 142.022,59.68 143.522,59.68 145.022,59.68 146.522,59.68 149.522,59.68 151.022,59.68 152.522,59.68 154.022,59.68 155.522,59.68 157.022,59.68 158.522,59.68 160.022,59.68 161.522,59.68 163.022,59.68 164.522,59.68 166.022,59.68 167.522,59.68 169.022,59.68 170.522,59.68 172.022,59.68 173.522,59.68 175.022,59.68 176.522,59.68 178.022,59.68 179.522,59.68 181.022,59.68 182.522,59.68 184.022,59.68 185.522,59.68 187.022,59.68 188.522,59.68 190.022,59.68 191.522,59.68 193.022,59.68 194.522,59.68 196.022,59.68 197.522,59.68 199.022,59.68 200.522,59.68 1.772,61.18 4.772,61.18 6.272,61.18 12.272,61.18 13.772,61.18 25.772,61.18 27.272,61.18 28.772,61.18 45.272,61.18 46.772,61.18 48.272,61.18 51.272,61.18 52.772,61.18 54.272,61.18 55.772,61.18 57.272,61.18 58.772,61.18 60.272,61.18 64.772,61.18 67.772,61.18 69.272,61.18 70.772,61.18 72.272,61.18 73.772,61.18 79.772,61.18 81.272,61.18 82.772,61.18 84.272,61.18 85.772,61.18 87.272,61.18 88.772,61.18 90.272,61.18 93.272,61.18 94.772,61.18 96.272,61.18 97.772,61.18 99.272,61.18 100.772,61.18 102.272,61.18 103.772,61.18 105.272,61.18 106.772,61.18 108.272,61.18 109.772,61.18 111.272,61.18 112.772,61.18 114.272,61.18 115.772,61.18 117.272,61.18 118.772,61.18 120.272,61.18 121.772,61.18 123.272,61.18 124.772,61.18 126.272,61.18 127.772,61.18 129.272,61.18 130.772,61.18 132.272,61.18 133.772,61.18 135.272,61.18 136.772,61.18 138.272,61.18 139.772,61.18 141.272,61.18 142.772,61.18 144.272,61.18 145.772,61.18 147.272,61.18 183.272,61.18 184.772,61.18 186.272,61.18 187.772,61.18 189.272,61.18 190.772,61.18 192.272,61.18 193.772,61.18 195.272,61.18 196.772,61.18 198.272,61.18 199.772,61.18 5.522,62.68 7.022,62.68 13.022,62.68 14.522,62.68 16.022,62.68 17.522,62.68 19.022,62.68 20.522,62.68 22.022,62.68 34.022,62.68 35.522,62.68 37.022,62.68 40.022,62.68 52.022,62.68 53.522,62.68 55.022,62.68 56.522,62.68 58.022,62.68 59.522,62.68 61.022,62.68 62.522,62.68 67.022,62.68 68.522,62.68 70.022,62.68 71.522,62.68 73.022,62.68 74.522,62.68 79.022,62.68 80.522,62.68 82.022,62.68 83.522,62.68 85.022,62.68 86.522,62.68 88.022,62.68 89.522,62.68 91.022,62.68 127.022,62.68 128.522,62.68 130.022,62.68 131.522,62.68 133.022,62.68 134.522,62.68 136.022,62.68 137.522,62.68 139.022,62.68 140.522,62.68 142.022,62.68 143.522,62.68 145.022,62.68 146.522,62.68 148.022,62.68 149.522,62.68 154.022,62.68 158.522,62.68 160.022,62.68 161.522,62.68 163.022,62.68 164.522,62.68 166.022,62.68 167.522,62.68 172.022,62.68 173.522,62.68 175.022,62.68 176.522,62.68 178.022,62.68 179.522,62.68 184.022,62.68 185.522,62.68 187.022,62.68 188.522,62.68 190.022,62.68 191.522,62.68 193.022,62.68 194.522,62.68 196.022,62.68 197.522,62.68 199.022,62.68 200.522,62.68 1.772,64.18 40.772,64.18 48.272,64.18 51.272,64.18 52.772,64.18 54.272,64.18 55.772,64.18 57.272,64.18 58.772,64.18 60.272,64.18 61.772,64.18 67.772,64.18 69.272,64.18 70.772,64.18 72.272,64.18 73.772,64.18 79.772,64.18 81.272,64.18 82.772,64.18 84.272,64.18 90.272,64.18 91.772,64.18 93.272,64.18 94.772,64.18 96.272,64.18 97.772,64.18 99.272,64.18 100.772,64.18 102.272,64.18 103.772,64.18 105.272,64.18 106.772,64.18 108.272,64.18 109.772,64.18 111.272,64.18 112.772,64.18 114.272,64.18 115.772,64.18 117.272,64.18 118.772,64.18 120.272,64.18 121.772,64.18 123.272,64.18 124.772,64.18 126.272,64.18 127.772,64.18 129.272,64.18 135.272,64.18 136.772,64.18 138.272,64.18 139.772,64.18 141.272,64.18 147.272,64.18 148.772,64.18 150.272,64.18 153.272,64.18 154.772,64.18 159.272,64.18 160.772,64.18 162.272,64.18 163.772,64.18 165.272,64.18 166.772,64.18 168.272,64.18 171.272,64.18 172.772,64.18 174.272,64.18 175.772,64.18 177.272,64.18 178.772,64.18 183.272,64.18 184.772,64.18 186.272,64.18 192.272,64.18 193.772,64.18 195.272,64.18 196.772,64.18 198.272,64.18 199.772,64.18 20.522,65.68 22.022,65.68 23.522,65.68 25.022,65.68 26.522,65.68 31.022,65.68 40.022,65.68 47.522,65.68 52.022,65.68 53.522,65.68 55.022,65.68 56.522,65.68 58.022,65.68 59.522,65.68 64.022,65.68 65.522,65.68 70.022,65.68 71.522,65.68 73.022,65.68 74.522,65.68 79.022,65.68 80.522,65.68 82.022,65.68 83.522,65.68 91.022,65.68 92.522,65.68 94.022,65.68 97.022,65.68 98.522,65.68 103.022,65.68 104.522,65.68 106.022,65.68 107.522,65.68 109.022,65.68 110.522,65.68 115.022,65.68 116.522,65.68 118.022,65.68 119.522,65.68 121.022,65.68 122.522,65.68 127.022,65.68 128.522,65.68 136.022,65.68 137.522,65.68 139.022,65.68 140.522,65.68 148.022,65.68 149.522,65.68 154.022,65.68 155.522,65.68 158.522,65.68 160.022,65.68 161.522,65.68 163.022,65.68 164.522,65.68 166.022,65.68 167.522,65.68 172.022,65.68 173.522,65.68 175.022,65.68 176.522,65.68 178.022,65.68 179.522,65.68 182.522,65.68 184.022,65.68 185.522,65.68 193.022,65.68 194.522,65.68 196.022,65.68 197.522,65.68 199.022,65.68 200.522,65.68 70.772,67.18 72.272,67.18 73.772,67.18 79.772,67.18 81.272,67.18 82.772,67.18 91.772,67.18 93.272,67.18 99.272,67.18 102.272,67.18 103.772,67.18 105.272,67.18 111.272,67.18 114.272,67.18 115.772,67.18 117.272,67.18 123.272,67.18 126.272,67.18 127.772,67.18 136.772,67.18 138.272,67.18 139.772,67.18 148.772,67.18 150.272,67.18 153.272,67.18 159.272,67.18 160.772,67.18 162.272,67.18 168.272,67.18 171.272,67.18 172.772,67.18 174.272,67.18 180.272,67.18 183.272,67.18 184.772,67.18 193.772,67.18 195.272,67.18 196.772,67.18 198.272,67.18 199.772,67.18 47.522,68.68 73.022,68.68 74.522,68.68 79.022,68.68 80.522,68.68 82.022,68.68 83.522,68.68 91.022,68.68 92.522,68.68 128.522,68.68 136.022,68.68 137.522,68.68 139.022,68.68 140.522,68.68 148.022,68.68 149.522,68.68 184.022,68.68 185.522,68.68 193.022,68.68 194.522,68.68 196.022,68.68 197.522,68.68 199.022,68.68 200.522,68.68 73.772,70.18 79.772,70.18 81.272,70.18 82.772,70.18 84.272,70.18 88.772,70.18 90.272,70.18 91.772,70.18 129.272,70.18 133.772,70.18 135.272,70.18 136.772,70.18 138.272,70.18 139.772,70.18 141.272,70.18 145.772,70.18 147.272,70.18 148.772,70.18 150.272,70.18 184.772,70.18 186.272,70.18 190.772,70.18 192.272,70.18 193.772,70.18 195.272,70.18 196.772,70.18 198.272,70.18 199.772,70.18 70.022,71.68 71.522,71.68 79.022,71.68 80.522,71.68 82.022,71.68 83.522,71.68 85.022,71.68 86.522,71.68 88.022,71.68 89.522,71.68 91.022,71.68 92.522,71.68 131.522,71.68 133.022,71.68 134.522,71.68 136.022,71.68 137.522,71.68 139.022,71.68 140.522,71.68 142.022,71.68 143.522,71.68 145.022,71.68 146.522,71.68 148.022,71.68 149.522,71.68 151.022,71.68 185.522,71.68 187.022,71.68 188.522,71.68 190.022,71.68 191.522,71.68 193.022,71.68 194.522,71.68 196.022,71.68 197.522,71.68 199.022,71.68 200.522,71.68 70.772,73.18 72.272,73.18 81.272,73.18 82.772,73.18 84.272,73.18 85.772,73.18 87.272,73.18 88.772,73.18 90.272,73.18 91.772,73.18 93.272,73.18 132.272,73.18 133.772,73.18 135.272,73.18 136.772,73.18 138.272,73.18 139.772,73.18 141.272,73.18 142.772,73.18 144.272,73.18 145.772,73.18 147.272,73.18 148.772,73.18 150.272,73.18 151.772,73.18 184.772,73.18 186.272,73.18 187.772,73.18 189.272,73.18 190.772,73.18 192.272,73.18 193.772,73.18 195.272,73.18 196.772,73.18 198.272,73.18 199.772,73.18 70.022,74.68 71.522,74.68 73.022,74.68 74.522,74.68 134.522,74.68 136.022,74.68 137.522,74.68 139.022,74.68 140.522,74.68 142.022,74.68 143.522,74.68 145.022,74.68 146.522,74.68 148.022,74.68 149.522,74.68 151.022,74.68 185.522,74.68 187.022,74.68 188.522,74.68 190.022,74.68 191.522,74.68 193.022,74.68 194.522,74.68 196.022,74.68 197.522,74.68 199.022,74.68 200.522,74.68 70.772,76.18 72.272,76.18 73.772,76.18 75.272,76.18 82.772,76.18 84.272,76.18 85.772,76.18 87.272,76.18 88.772,76.18 90.272,76.18 91.772,76.18 93.272,76.18 94.772,76.18 96.272,76.18 135.272,76.18 136.772,76.18 138.272,76.18 139.772,76.18 141.272,76.18 142.772,76.18 144.272,76.18 145.772,76.18 147.272,76.18 148.772,76.18 150.272,76.18 151.772,76.18 184.772,76.18 186.272,76.18 187.772,76.18 189.272,76.18 190.772,76.18 192.272,76.18 193.772,76.18 195.272,76.18 196.772,76.18 198.272,76.18 199.772,76.18 70.022,77.68 71.522,77.68 73.022,77.68 74.522,77.68 76.022,77.68 77.522,77.68 85.022,77.68 86.522,77.68 88.022,77.68 89.522,77.68 91.022,77.68 92.522,77.68 94.022,77.68 95.522,77.68 97.022,77.68 137.522,77.68 139.022,77.68 140.522,77.68 142.022,77.68 143.522,77.68 145.022,77.68 146.522,77.68 148.022,77.68 149.522,77.68 151.022,77.68 185.522,77.68 187.022,77.68 193.022,77.68 194.522,77.68 200.522,77.68 70.772,79.18 72.272,79.18 73.772,79.18 75.272,79.18 76.772,79.18 78.272,79.18 85.772,79.18 87.272,79.18 88.772,79.18 90.272,79.18 91.772,79.18 93.272,79.18 94.772,79.18 96.272,79.18 97.772,79.18 99.272,79.18 138.272,79.18 139.772,79.18 141.272,79.18 142.772,79.18 144.272,79.18 145.772,79.18 147.272,79.18 148.772,79.18 150.272,79.18 151.772,79.18 184.772,79.18 186.272,79.18 187.772,79.18 192.272,79.18 193.772,79.18 199.772,79.18 70.022,80.68 71.522,80.68 73.022,80.68 74.522,80.68 76.022,80.68 77.522,80.68 79.022,80.68 80.522,80.68 88.022,80.68 89.522,80.68 91.022,80.68 92.522,80.68 94.022,80.68 95.522,80.68 97.022,80.68 98.522,80.68 100.022,80.68 140.522,80.68 142.022,80.68 143.522,80.68 145.022,80.68 146.522,80.68 148.022,80.68 149.522,80.68 151.022,80.68 185.522,80.68 187.022,80.68 188.522,80.68 191.522,80.68 193.022,80.68 194.522,80.68 196.022,80.68 197.522,80.68 199.022,80.68 200.522,80.68 70.772,82.18 72.272,82.18 73.772,82.18 75.272,82.18 76.772,82.18 78.272,82.18 79.772,82.18 81.272,82.18 88.772,82.18 90.272,82.18 91.772,82.18 93.272,82.18 94.772,82.18 96.272,82.18 97.772,82.18 99.272,82.18 100.772,82.18 102.272,82.18 141.272,82.18 142.772,82.18 144.272,82.18 145.772,82.18 147.272,82.18 148.772,82.18 150.272,82.18 151.772,82.18 184.772,82.18 186.272,82.18 187.772,82.18 192.272,82.18 193.772,82.18 195.272,82.18 199.772,82.18 70.022,83.68 71.522,83.68 73.022,83.68 74.522,83.68 76.022,83.68 77.522,83.68 79.022,83.68 80.522,83.68 82.022,83.68 83.522,83.68 91.022,83.68 92.522,83.68 94.022,83.68 95.522,83.68 97.022,83.68 98.522,83.68 100.022,83.68 101.522,83.68 103.022,83.68 143.522,83.68 145.022,83.68 146.522,83.68 148.022,83.68 149.522,83.68 151.022,83.68 185.522,83.68 187.022,83.68 193.022,83.68 194.522,83.68 200.522,83.68 1.772,85.18 3.272,85.18 4.772,85.18 6.272,85.18 7.772,85.18 9.272,85.18 10.772,85.18 12.272,85.18 13.772,85.18 15.272,85.18 16.772,85.18 18.272,85.18 19.772,85.18 21.272,85.18 70.772,85.18 72.272,85.18 73.772,85.18 75.272,85.18 76.772,85.18 78.272,85.18 79.772,85.18 81.272,85.18 82.772,85.18 84.272,85.18 91.772,85.18 93.272,85.18 94.772,85.18 96.272,85.18 97.772,85.18 99.272,85.18 100.772,85.18 102.272,85.18 103.772,85.18 105.272,85.18 144.272,85.18 145.772,85.18 147.272,85.18 148.772,85.18 150.272,85.18 151.772,85.18 184.772,85.18 186.272,85.18 187.772,85.18 192.272,85.18 193.772,85.18 195.272,85.18 199.772,85.18 2.522,86.68 4.022,86.68 5.522,86.68 7.022,86.68 8.522,86.68 10.022,86.68 11.522,86.68 70.022,86.68 71.522,86.68 73.022,86.68 74.522,86.68 76.022,86.68 77.522,86.68 79.022,86.68 80.522,86.68 82.022,86.68 83.522,86.68 85.022,86.68 86.522,86.68 94.022,86.68 95.522,86.68 97.022,86.68 98.522,86.68 100.022,86.68 101.522,86.68 103.022,86.68 104.522,86.68 106.022,86.68 146.522,86.68 148.022,86.68 149.522,86.68 151.022,86.68 185.522,86.68 187.022,86.68 188.522,86.68 190.022,86.68 191.522,86.68 193.022,86.68 194.522,86.68 196.022,86.68 197.522,86.68 199.022,86.68 200.522,86.68 1.772,88.18 3.272,88.18 4.772,88.18 6.272,88.18 7.772,88.18 9.272,88.18 10.772,88.18 12.272,88.18 70.772,88.18 72.272,88.18 73.772,88.18 75.272,88.18 76.772,88.18 78.272,88.18 79.772,88.18 81.272,88.18 82.772,88.18 84.272,88.18 85.772,88.18 88.772,88.18 94.772,88.18 96.272,88.18 97.772,88.18 99.272,88.18 100.772,88.18 102.272,88.18 103.772,88.18 105.272,88.18 106.772,88.18 108.272,88.18 147.272,88.18 148.772,88.18 150.272,88.18 151.772,88.18 184.772,88.18 186.272,88.18 187.772,88.18 189.272,88.18 190.772,88.18 192.272,88.18 193.772,88.18 195.272,88.18 196.772,88.18 198.272,88.18 199.772,88.18 2.522,89.68 4.022,89.68 5.522,89.68 7.022,89.68 8.522,89.68 10.022,89.68 11.522,89.68 70.022,89.68 71.522,89.68 73.022,89.68 74.522,89.68 76.022,89.68 77.522,89.68 79.022,89.68 80.522,89.68 82.022,89.68 83.522,89.68 85.022,89.68 86.522,89.68 88.022,89.68 89.522,89.68 97.022,89.68 98.522,89.68 100.022,89.68 101.522,89.68 103.022,89.68 104.522,89.68 106.022,89.68 107.522,89.68 109.022,89.68 146.522,89.68 148.022,89.68 149.522,89.68 151.022,89.68 185.522,89.68 187.022,89.68 188.522,89.68 190.022,89.68 191.522,89.68 193.022,89.68 194.522,89.68 196.022,89.68 197.522,89.68 199.022,89.68 200.522,89.68 1.772,91.18 3.272,91.18 4.772,91.18 6.272,91.18 7.772,91.18 9.272,91.18 10.772,91.18 12.272,91.18 72.272,91.18 73.772,91.18 75.272,91.18 76.772,91.18 78.272,91.18 79.772,91.18 81.272,91.18 82.772,91.18 84.272,91.18 85.772,91.18 88.772,91.18 90.272,91.18 91.772,91.18 97.772,91.18 99.272,91.18 100.772,91.18 102.272,91.18 103.772,91.18 105.272,91.18 106.772,91.18 108.272,91.18 109.772,91.18 111.272,91.18 147.272,91.18 148.772,91.18 150.272,91.18 151.772,91.18 184.772,91.18 186.272,91.18 187.772,91.18 189.272,91.18 190.772,91.18 192.272,91.18 193.772,91.18 195.272,91.18 196.772,91.18 198.272,91.18 199.772,91.18 2.522,92.68 4.022,92.68 5.522,92.68 7.022,92.68 8.522,92.68 10.022,92.68 11.522,92.68 73.022,92.68 74.522,92.68 76.022,92.68 77.522,92.68 79.022,92.68 80.522,92.68 82.022,92.68 83.522,92.68 85.022,92.68 86.522,92.68 88.022,92.68 89.522,92.68 91.022,92.68 92.522,92.68 100.022,92.68 101.522,92.68 103.022,92.68 104.522,92.68 106.022,92.68 107.522,92.68 109.022,92.68 110.522,92.68 112.022,92.68 146.522,92.68 148.022,92.68 149.522,92.68 151.022,92.68 185.522,92.68 187.022,92.68 188.522,92.68 190.022,92.68 191.522,92.68 193.022,92.68 194.522,92.68 196.022,92.68 197.522,92.68 199.022,92.68 200.522,92.68 1.772,94.18 3.272,94.18 4.772,94.18 6.272,94.18 7.772,94.18 9.272,94.18 10.772,94.18 12.272,94.18 70.772,94.18 72.272,94.18 73.772,94.18 75.272,94.18 76.772,94.18 78.272,94.18 79.772,94.18 81.272,94.18 82.772,94.18 84.272,94.18 88.772,94.18 91.772,94.18 195.272,94.18 196.772,94.18 198.272,94.18 199.772,94.18 2.522,95.68 4.022,95.68 5.522,95.68 7.022,95.68 8.522,95.68 10.022,95.68 11.522,95.68 70.022,95.68 71.522,95.68 73.022,95.68 74.522,95.68 76.022,95.68 77.522,95.68 79.022,95.68 80.522,95.68 82.022,95.68 83.522,95.68 85.022,95.68 86.522,95.68 88.022,95.68 89.522,95.68 94.022,95.68 194.522,95.68 196.022,95.68 197.522,95.68 199.022,95.68 200.522,95.68 1.772,97.18 3.272,97.18 4.772,97.18 6.272,97.18 7.772,97.18 9.272,97.18 10.772,97.18 12.272,97.18 79.772,97.18 81.272,97.18 82.772,97.18 84.272,97.18 85.772,97.18 195.272,97.18 196.772,97.18 198.272,97.18 199.772,97.18 2.522,98.68 4.022,98.68 5.522,98.68 7.022,98.68 8.522,98.68 10.022,98.68 11.522,98.68 80.522,98.68 82.022,98.68 83.522,98.68 85.022,98.68 86.522,98.68 88.022,98.68 89.522,98.68 91.022,98.68 94.022,98.68 194.522,98.68 196.022,98.68 197.522,98.68 199.022,98.68 200.522,98.68 1.772,100.18 3.272,100.18 4.772,100.18 6.272,100.18 9.272,100.18 10.772,100.18 12.272,100.18 82.772,100.18 84.272,100.18 85.772,100.18 87.272,100.18 88.772,100.18 90.272,100.18 93.272,100.18 94.772,100.18 195.272,100.18 196.772,100.18 198.272,100.18 199.772,100.18 2.522,101.68 4.022,101.68 5.522,101.68 11.522,101.68 83.522,101.68 85.022,101.68 86.522,101.68 88.022,101.68 89.522,101.68 91.022,101.68